# Altium PCB slave.PcbDoc (part 3 of 7)
Units mil, origin at the board's own origin, x right, y up, seen from the top; angles counter-clockwise.
Board outline 6299.21 x 3937.01 mil, 6 copper layers (Top Copper, FUSED_VBAT-, Signal Layer 2, Signal Layer 3, VREG, Bot Copper), stack 65.355 mil thick; 495 components, 307 nets, 1435 pads, 1866 vias.
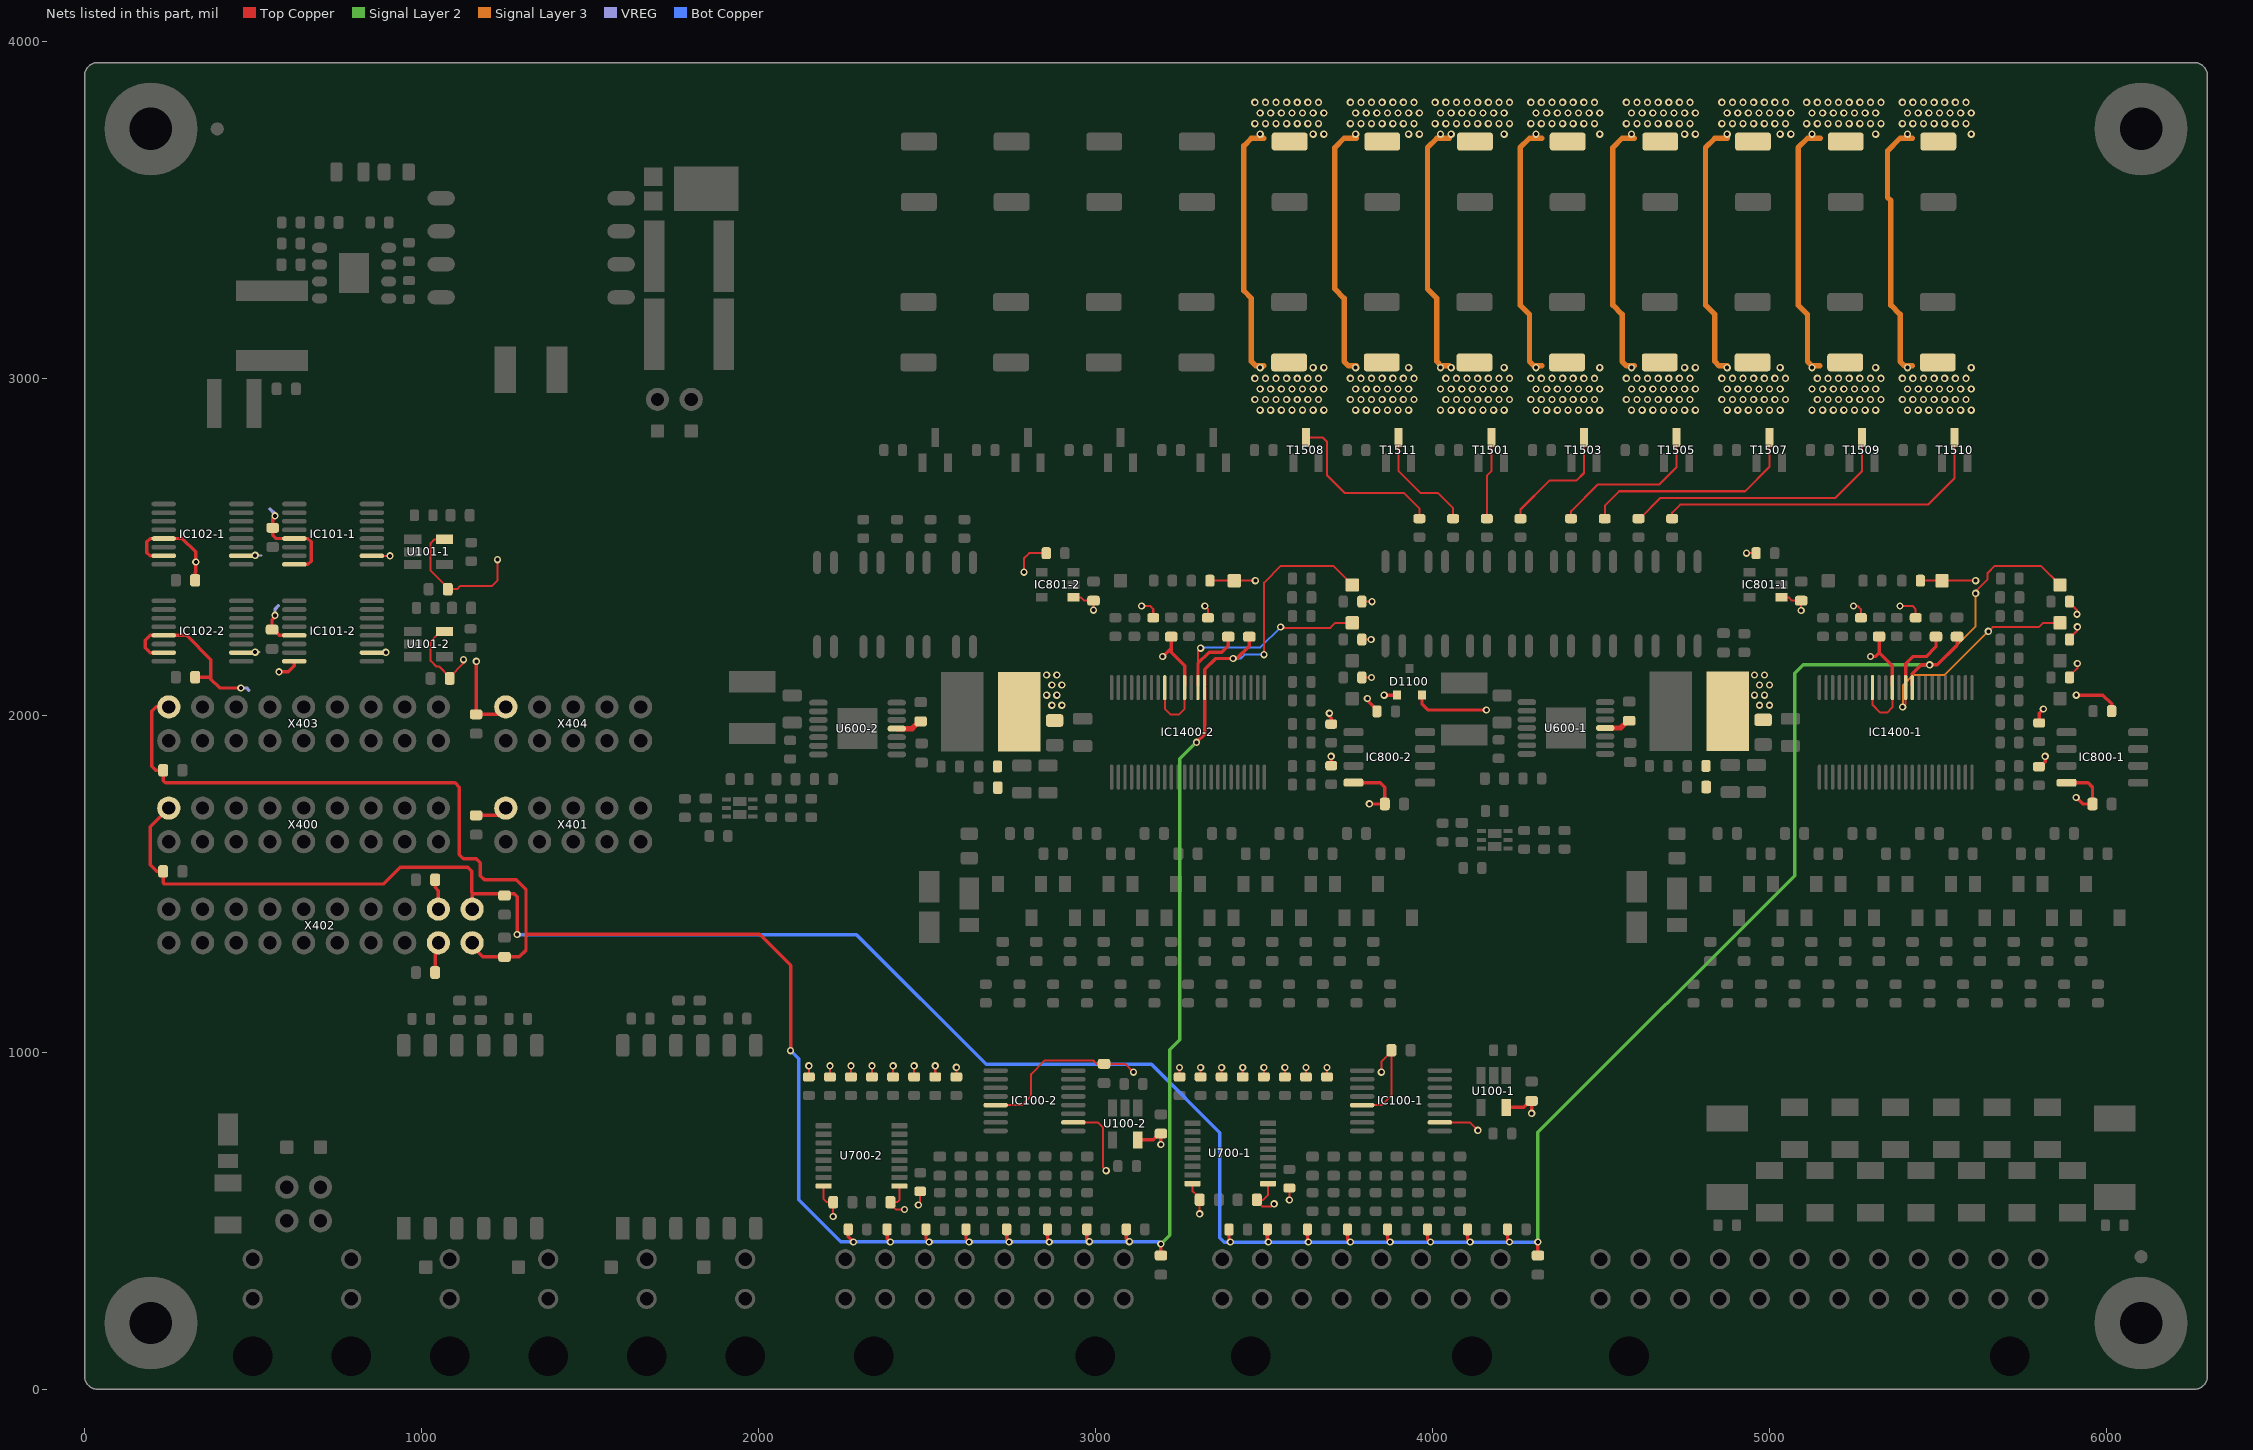
[diagram p6: the nets of this part, all layers, seen from the top]

## Via types
v1: diameter 21.65, hole 11.81, Top Copper to Bot Copper, tented both sides, 1848 vias
v2: diameter 35.43, hole 23.62, Top Copper to Bot Copper, 15 vias
v3: diameter 29.53, hole 19.68, Top Copper to Bot Copper, tented both sides, 3 vias

## Nets (pads, with @x,y where several pads share a name; then routed paths per layer and width w, separated by ;. In a path a pad name is that pad's centre, name@x,y a point inside that pad or via, vN(x,y) a via of type N, cw(c..) or ccw(c..) an arc to the next point about the centre after c; other vN are vias at no path point) (continued)
BST_1: (continued)
  Top Copper w16: U600-2.11@2409.79,1960.73 2455.76,1960.73 2477.21,1982.19 C601-2.2@2481.15,1982.19
CELL0_FEEDBACK+: R1110.1 R1534.2 R1535.2 T1510.3 | length 1793.3
  Top Copper w6: R1110.1@4710.92,2583.81 4710.92,2601.59 4734.33,2625 5470,2625 5549.21,2704.21 T1510.3@5549.21,2824.41 T1510.3@5549.21,2826.38
  Signal Layer 3 w16: 5424.21,3037.01 5400.49,3037.01 5387.5,3050 5387.5,3189.82 5360,3217.32 5360,3527.32 5350,3537.32 5350,3675 5387.5,3712.5 5423.72,3712.5 5424.21,3712.01
  other v1: 5409.46,2905.52 5440.95,2905.52 5472.45,2905.52 5503.94,2905.52 5535.44,2905.52 5566.94,2905.52 5598.43,2905.52 5393.71,2937.01 5425.2,2937.01 5456.7,2937.01 5488.2,2937.01 5519.69,2937.01 5551.19,2937.01 5582.68,2937.01 5409.46,2968.51 5440.95,2968.51 5472.45,2968.51 5503.94,2968.51 5535.44,2968.51 5566.94,2968.51 5598.43,2968.51 5393.71,3000 5425.2,3000 5456.7,3000 5488.2,3000 5519.69,3000 5551.19,3000 5582.68,3000 5409.46,3031.5 5598.43,3031.5 5409.46,3724.41 5598.43,3724.41 5393.71,3755.91 5425.2,3755.91 5456.7,3755.91 5488.2,3755.91 5519.69,3755.91 5551.19,3755.91 5582.68,3755.91 5409.46,3787.41 5440.95,3787.41 5472.45,3787.41 5503.94,3787.41 5535.44,3787.41 5566.94,3787.41 5598.43,3787.41 5393.71,3818.9 5425.2,3818.9 5456.7,3818.9 5488.2,3818.9 5519.69,3818.9 5551.19,3818.9 5582.68,3818.9
CELL1_FEEDBACK+: R1108.1 R1526.2 R1527.2 T1509.3 | length 1589.2
  Top Copper w6: R1108.1@4610.92,2583.81 4614.86,2583.81 4676.05,2645 5195,2645 5274.21,2724.21 T1509.3@5274.21,2824.41 T1509.3@5274.21,2826.38
  Signal Layer 3 w16: 5149.21,3037.01 5125.49,3037.01 5112.5,3050 5112.5,3189.82 5085,3217.32 5085,3685 5112.5,3712.5 5149.7,3712.5 ; 5149.21,3712.01 5149.7,3712.5 ; 5150,3712.5 5149.7,3712.5
  other v1: 5125.99,2905.52 5157.49,2905.52 5188.98,2905.52 5220.48,2905.52 5251.98,2905.52 5283.47,2905.52 5314.97,2905.52 5141.74,2937.01 5173.24,2937.01 5204.73,2937.01 5236.23,2937.01 5267.72,2937.01 5299.22,2937.01 5330.72,2937.01 5125.99,2968.51 5157.49,2968.51 5188.98,2968.51 5220.48,2968.51 5251.98,2968.51 5283.47,2968.51 5314.97,2968.51 5141.74,3000 5173.24,3000 5204.73,3000 5236.23,3000 5267.72,3000 5299.22,3000 5330.72,3000 5125.99,3031.5 5314.97,3031.5 5125.99,3724.41 5314.97,3724.41 5110.24,3755.91 5141.74,3755.91 5173.24,3755.91 5204.73,3755.91 5236.23,3755.91 5267.72,3755.91 5299.22,3755.91 5330.72,3755.91 5125.99,3787.41 5157.49,3787.41 5188.98,3787.41 5220.48,3787.41 5251.98,3787.41 5283.47,3787.41 5314.97,3787.41 5110.24,3818.9 5141.74,3818.9 5173.24,3818.9 5204.73,3818.9 5236.23,3818.9 5267.72,3818.9 5299.22,3818.9 5330.72,3818.9
CELL2_FEEDBACK+: R1106.1 R1522.2 R1523.2 T1507.3 | length 1427.9
  Top Copper w6: R1106.1@4510.92,2583.81 4510.92,2622.17 4553.75,2665 4927.2,2665 4999.21,2737.01 T1507.3@4999.21,2824.41 T1507.3@4999.21,2826.38
  Signal Layer 3 w16: v1@4874.21,3037.01 4850.49,3037.01 4837.5,3050 4837.5,3189.82 4810,3217.32 4810,3685 4837.5,3712.5 4873.72,3712.5 4874.21,3712.01
  other v1: 4874.02,2905.52 4905.52,2905.52 4937.01,2905.52 4968.51,2905.52 5000.01,2905.52 5031.5,2905.52 4858.27,2937.01 4889.77,2937.01 4921.27,2937.01 4952.76,2937.01 4984.26,2937.01 5015.76,2937.01 5047.25,2937.01 4874.02,2968.51 4905.52,2968.51 4937.01,2968.51 4968.51,2968.51 5000.01,2968.51 5031.5,2968.51 4858.27,3000 4889.77,3000 4921.27,3000 4952.76,3000 4984.26,3000 5015.76,3000 5047.25,3000 4874.02,3031.5 5031.5,3031.5 4874.02,3724.41 5031.5,3724.41 5063,3724.41 4858.27,3755.91 4889.77,3755.91 4921.27,3755.91 4952.76,3755.91 4984.26,3755.91 5015.76,3755.91 5047.25,3755.91 4874.02,3787.41 4905.52,3787.41 4937.01,3787.41 4968.51,3787.41 5000.01,3787.41 5031.5,3787.41 5063,3787.41 4858.27,3818.9 4889.77,3818.9 4921.27,3818.9 4952.76,3818.9 4984.26,3818.9 5015.76,3818.9 5047.25,3818.9
CELL3_FEEDBACK+: R1104.1 R1516.2 R1517.2 T1505.3 | length 1243.4
  Top Copper w6: R1104.1@4410.92,2583.81 4410.92,2605.92 4490,2685 4672.2,2685 4724.21,2737.01 T1505.3@4724.21,2824.41 T1505.3@4724.21,2826.38
  Signal Layer 3 w16: v1@4599.21,3037.01 4575.49,3037.01 4562.5,3050 4562.5,3189.82 4535,3217.32 4535,3685 4562.5,3712.5 4598.72,3712.5 4599.21,3712.01
  other v1: 4590.56,2905.52 4622.05,2905.52 4653.55,2905.52 4685.05,2905.52 4716.54,2905.52 4748.04,2905.52 4779.53,2905.52 4574.81,2937.01 4606.31,2937.01 4637.8,2937.01 4669.3,2937.01 4700.79,2937.01 4732.29,2937.01 4763.79,2937.01 4590.56,2968.51 4622.05,2968.51 4653.55,2968.51 4685.05,2968.51 4716.54,2968.51 4748.04,2968.51 4779.53,2968.51 4574.81,3000 4606.31,3000 4637.8,3000 4669.3,3000 4700.79,3000 4732.29,3000 4763.79,3000 4590.56,3031.5 4748.04,3031.5 4779.53,3031.5 4590.56,3724.41 4748.04,3724.41 4779.53,3724.41 4574.81,3755.91 4606.31,3755.91 4637.8,3755.91 4669.3,3755.91 4700.79,3755.91 4732.29,3755.91 4763.79,3755.91 4590.56,3787.41 4622.05,3787.41 4653.55,3787.41 4685.05,3787.41 4716.54,3787.41 4748.04,3787.41 4779.53,3787.41 4574.81,3818.9 4606.31,3818.9 4637.8,3818.9 4669.3,3818.9 4700.79,3818.9 4732.29,3818.9 4763.79,3818.9
CELL4_FEEDBACK+: R1102.1 R1510.2 R1511.2 T1503.3 | length 1120.5
  Top Copper w6: R1102.1@4260.92,2595.06 4260.92,2610.92 4346.34,2696.34 4426.34,2696.34 4449.21,2719.21 T1503.3@4449.21,2824.41 T1503.3@4449.21,2826.38
  Signal Layer 3 w16: 4324.21,3037.01 4300.49,3037.01 4287.5,3050 4287.5,3189.82 4260,3217.32 4260,3685 4287.5,3712.5 4323.72,3712.5 4324.21,3712.01
  other v1: 4307.09,2905.52 4338.59,2905.52 4370.09,2905.52 4401.58,2905.52 4433.08,2905.52 4464.57,2905.52 4496.07,2905.52 4291.34,2937.01 4322.84,2937.01 4354.34,2937.01 4385.83,2937.01 4417.33,2937.01 4448.83,2937.01 4480.32,2937.01 4307.09,2968.51 4338.59,2968.51 4370.09,2968.51 4401.58,2968.51 4433.08,2968.51 4464.57,2968.51 4496.07,2968.51 4291.34,3000 4322.84,3000 4354.34,3000 4385.83,3000 4417.33,3000 4448.83,3000 4480.32,3000 4307.09,3031.5 4496.07,3031.5 4307.09,3724.41 4496.07,3724.41 4291.34,3755.91 4322.84,3755.91 4354.34,3755.91 4385.83,3755.91 4417.33,3755.91 4448.83,3755.91 4480.32,3755.91 4307.09,3787.41 4338.59,3787.41 4370.09,3787.41 4401.58,3787.41 4433.08,3787.41 4464.57,3787.41 4496.07,3787.41 4291.34,3818.9 4322.84,3818.9 4354.34,3818.9 4385.83,3818.9 4417.33,3818.9 4448.83,3818.9 4480.32,3818.9
CELL5_FEEDBACK+: R1100.1 R1504.2 R1505.2 T1501.3 | length 1012.4
  Top Copper w6: R1100.1@4160.92,2583.81 4160.92,2711.22 4174.21,2724.51 T1501.3@4174.21,2824.41 T1501.3@4174.21,2826.38
  Signal Layer 3 w16: v1@4049.21,3037.01 4025.49,3037.01 4012.5,3050 4012.5,3237.5 3985,3265 3985,3685 4012.5,3712.5 4048.72,3712.5 4049.21,3712.01
  other v1: 4023.63,2905.52 4055.12,2905.52 4086.62,2905.52 4118.12,2905.52 4149.61,2905.52 4181.11,2905.52 4212.6,2905.52 4039.38,2937.01 4070.87,2937.01 4102.37,2937.01 4133.86,2937.01 4165.36,2937.01 4196.86,2937.01 4228.35,2937.01 4023.63,2968.51 4055.12,2968.51 4086.62,2968.51 4118.12,2968.51 4149.61,2968.51 4181.11,2968.51 4212.6,2968.51 4039.38,3000 4070.87,3000 4102.37,3000 4133.86,3000 4165.36,3000 4196.86,3000 4228.35,3000 4023.63,3031.5 4055.12,3031.5 4212.6,3031.5 4023.63,3724.41 4055.12,3724.41 4212.6,3724.41 4007.88,3755.91 4039.38,3755.91 4070.87,3755.91 4102.37,3755.91 4133.86,3755.91 4165.36,3755.91 4196.86,3755.91 4228.35,3755.91 4023.63,3787.41 4055.12,3787.41 4086.62,3787.41 4118.12,3787.41 4149.61,3787.41 4181.11,3787.41 4212.6,3787.41 4007.88,3818.9 4039.38,3818.9 4070.87,3818.9 4102.37,3818.9 4133.86,3818.9 4165.36,3818.9 4196.86,3818.9 4228.35,3818.9
CELL6_FEEDBACK+: R1111.1 R1532.2 R1533.2 T1511.3 | length 1103.9
  Top Copper w6: T1511.3@3899.21,2826.38 T1511.3@3899.21,2824.41 3899.21,2724.51 3963.72,2660 4015,2660 4060.92,2614.08 R1111.1@4060.92,2583.81
  Signal Layer 3 w16: v1@3774.21,3037.01 3750.49,3037.01 3737.5,3050 3737.5,3237.5 3710,3265 3710,3685 3737.5,3712.5 3773.72,3712.5 3774.21,3712.01
  other v1: 3771.66,2905.52 3803.16,2905.52 3834.65,2905.52 3866.15,2905.52 3897.64,2905.52 3929.14,2905.52 3755.91,2937.01 3787.41,2937.01 3818.9,2937.01 3850.4,2937.01 3881.9,2937.01 3913.39,2937.01 3944.89,2937.01 3771.66,2968.51 3803.16,2968.51 3834.65,2968.51 3866.15,2968.51 3897.64,2968.51 3929.14,2968.51 3755.91,3000 3787.41,3000 3818.9,3000 3850.4,3000 3881.9,3000 3913.39,3000 3944.89,3000 3771.66,3031.5 3929.14,3031.5 3771.66,3724.41 3929.14,3724.41 3960.64,3724.41 3755.91,3755.91 3787.41,3755.91 3818.9,3755.91 3850.4,3755.91 3881.9,3755.91 3913.39,3755.91 3944.89,3755.91 3771.66,3787.41 3803.16,3787.41 3834.65,3787.41 3866.15,3787.41 3897.64,3787.41 3929.14,3787.41 3960.64,3787.41 3755.91,3818.9 3787.41,3818.9 3818.9,3818.9 3850.4,3818.9 3881.9,3818.9 3913.39,3818.9 3944.89,3818.9
CELL7_FEEDBACK+: R1109.1 R1528.2 R1529.2 T1508.3 | length 1272.9
  Top Copper w6: T1508.3@3624.21,2824.41 3674.11,2824.41 3674.21,2824.51 3686.71,2812.01 3686.71,2712.01 3738.72,2660 3915,2660 3960.92,2614.08 R1109.1@3960.92,2583.81
  Signal Layer 3 w16: 3499.21,3037.01 3475.49,3037.01 3462.5,3050 3462.5,3237.5 3440,3260 3440,3690 3462.5,3712.5 3498.72,3712.5 3499.21,3712.01
  other v1: 3488.19,2905.52 3519.69,2905.52 3551.19,2905.52 3582.68,2905.52 3614.18,2905.52 3645.67,2905.52 3677.17,2905.52 3472.45,2937.01 3503.94,2937.01 3535.44,2937.01 3566.93,2937.01 3598.43,2937.01 3629.93,2937.01 3661.42,2937.01 3488.19,2968.51 3519.69,2968.51 3551.19,2968.51 3582.68,2968.51 3614.18,2968.51 3645.67,2968.51 3677.17,2968.51 3472.45,3000 3503.94,3000 3535.44,3000 3566.93,3000 3598.43,3000 3629.93,3000 3661.42,3000 3488.19,3031.5 3645.67,3031.5 3677.17,3031.5 3488.19,3724.41 3645.67,3724.41 3677.17,3724.41 3472.45,3755.91 3503.94,3755.91 3535.44,3755.91 3566.93,3755.91 3598.43,3755.91 3629.93,3755.91 3661.42,3755.91 3488.19,3787.41 3519.69,3787.41 3551.19,3787.41 3582.68,3787.41 3614.18,3787.41 3645.67,3787.41 3677.17,3787.41 3472.45,3818.9 3503.94,3818.9 3535.44,3818.9 3566.93,3818.9 3598.43,3818.9 3629.93,3818.9 3661.42,3818.9